# Altium PCB video.altium-ascii.PcbDoc (part 2 of 5)
Units mil, origin at the board's own origin, x right, y up, seen from the top; angles counter-clockwise.
Board outline 12285 x 4200 mil, 4 copper layers (top_copper, Mid-Layer 1, Mid-Layer 2, Bottom Layer), stack 68.6 mil thick; 189 components, 588 nets, 2118 pads, 808 vias.
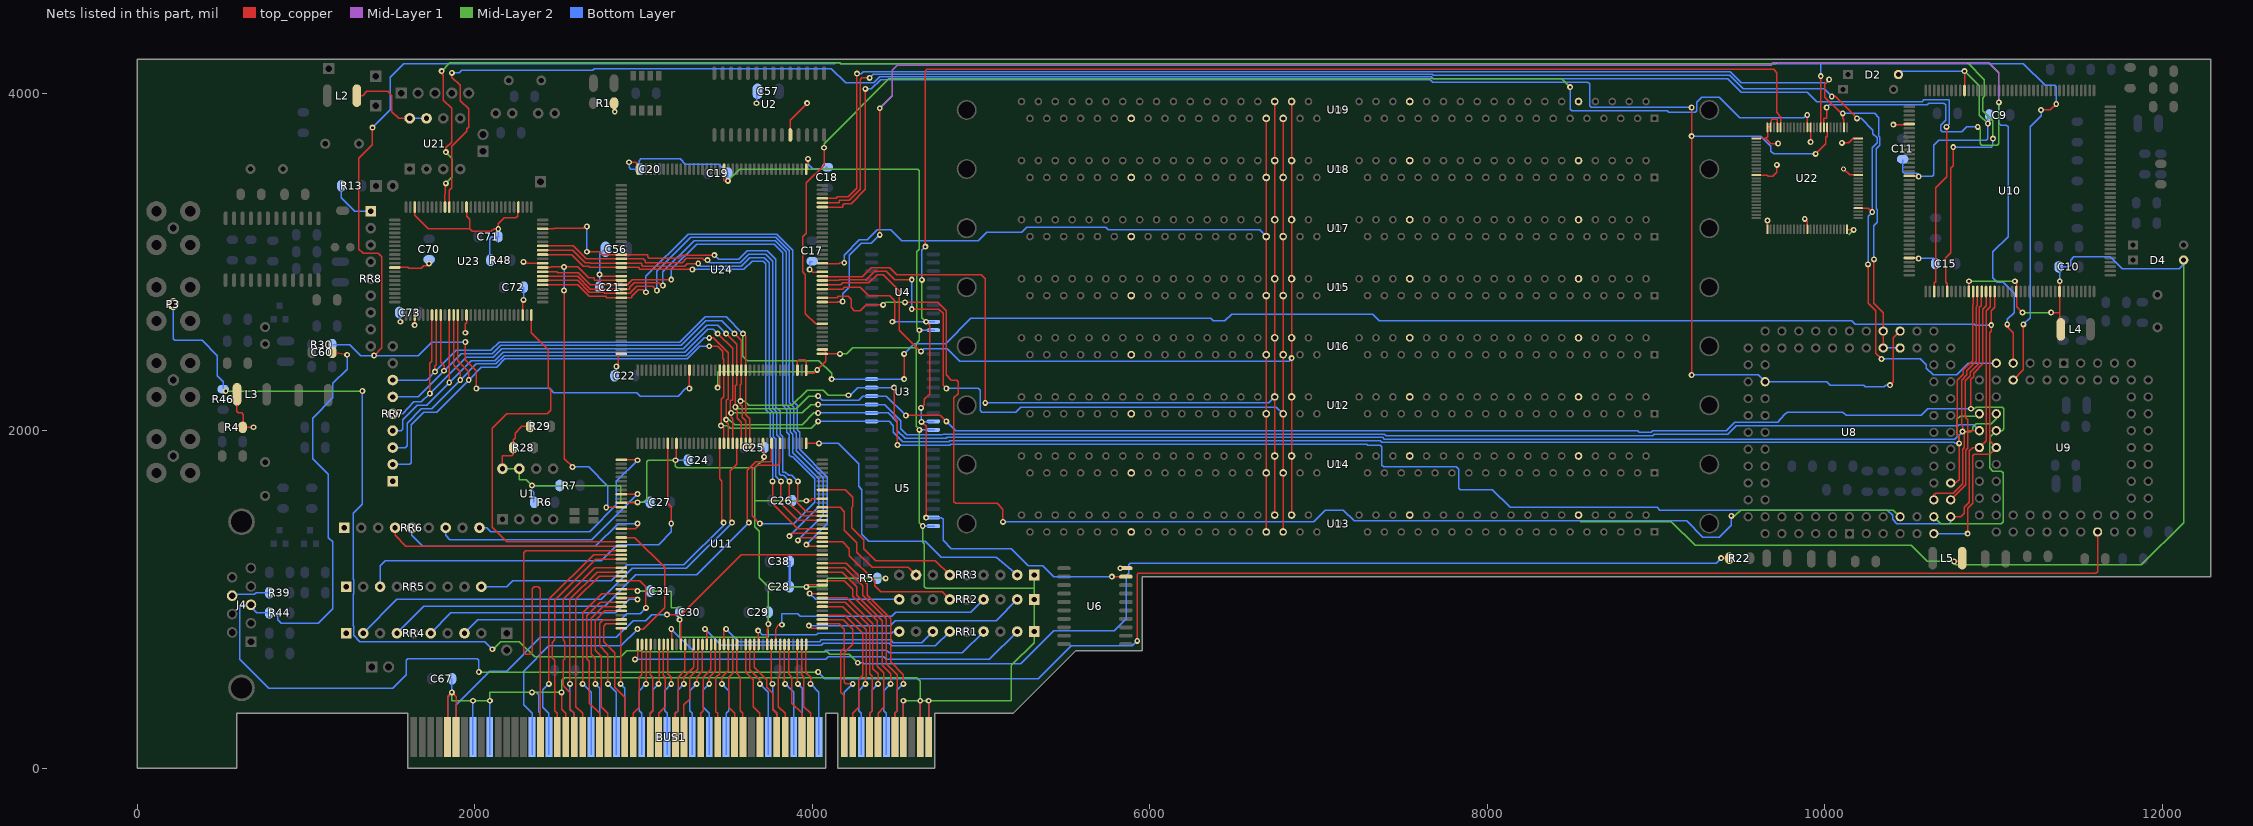
[diagram p4: the nets of this part, all layers, seen from the top]

## Via types
v1: diameter 35, hole 15.75, top_copper to Bottom Layer, 807 vias
v2: diameter 31.5, hole 15.75, top_copper to Bottom Layer, 1 vias

## Nets (pads, with @x,y where several pads share a name; then routed paths per layer and width w, separated by ;. In a path a pad name is that pad's centre, name@x,y a point inside that pad or via, vN(x,y) a via of type N, cw(c..) or ccw(c..) an arc to the next point about the centre after c; other vN are vias at no path point) (continued)
+5V: BUS1.A5 BUS1.A8 BUS1.A10 BUS1.A16 BUS1.A59 BUS1.A61 BUS1.A62 BUS1.B5 BUS1.B6 BUS1.B19 BUS1.B59 BUS1.B61 BUS1.B62 C9.1 C10.1 C11.1 C15.1 C17.1 C18.1 C19.1 C20.1 C21.1 C22.1 C24.1 C25.1 C26.1 C27.1 C28.1 C29.1 C30.1 C31.1 C38.1 C56.1 C57.1 C67.1 C70.1 C71.1 C72.1 C73.1 D2.2 D4.2 L2.1 L3.1 L4.1 L5.1 R1.2 R4.2 R5.2 R6.2 R7.2 R13.1 R28.1 R29.1 R48.1 RR1.1 RR2.1 RR3.1 RR4.1 RR5.1 RR6.1 RR7.1 RR8.1 U1.7 U1.8 U2.10 U3.20 U4.20 U5.20 U6.20 U10.31 U10.45 U10.57 U10.76 U10.91 U10.102 U10.112 U11.11 U11.31 U11.51 U11.71 U11.91 U11.111 U11.131 U11.151 U12.10 U12.30 U12.59 U13.10 U13.30 U13.59 U14.10 U14.30 U14.59 U15.10 U15.30 U15.59 U16.10 U16.30 U16.59 U17.10 U17.30 U17.59 U18.10 U18.30 U18.59 U19.10 U19.30 U19.59 U21.7 U21.8 U22.12 U22.22 U22.24 U22.25 U22.26 U22.37 U22.51 U22.63 U22.75 U22.89 U22.100 U23.3 U23.15 U23.28 U23.40 U23.54 U23.66 U23.78 U23.92 U24.20 U24.38 U24.40 U24.41 U24.42 U24.60 U24.81 U24.100 U24.120 U24.142 U24.160 | length 39088.7
  top_copper w7.87: L3.1@590,2215 590,2115 600,2105 620,2105 630,2095 630,2020 v1(690,2020) ; L2.1@1304.07,3985 1336.46,3985 1361.46,4010 1485,4010 1510,3985 1510,3890 1550,3850 U21.8@1615,3850 ; U23.92@1530,2967 1605,2967 1610,2962 1685,2962 1700,2977 1730,2977 v1(1730,2990) ; v1(1645,2625) U23.3@1645,2690 ; U23.78@1645,3320 1645,3275 1725,3195 1970,3195 ; BUS1.B5@1840,80 BUS1.B5@1840,185 1840,425 v1(1865,450) 1890,425 BUS1.B6@1890,185 BUS1.B6@1890,80 ; v1(1945,2580) 1945,2635 1952,2635 U23.15@1952,2690 ; U23.66@1952,3320 1952,3270 1970,3252 1970,3195 ; U1.8@2165,1775 2165,1850 2220,1850 2230,1860 2230,1900 2230,1945 2240,1955 2240,1985 2280,2025 R29.1@2325,2025 ; U23.54@2259,3320 2255,3290 2255,3270 2245,3260 2175,3260 2140,3225 v1(2140,3195) 2115,3195 2100,3180 1985,3180 1970,3195 ; U23.28@2285,2690 2285,2775 v1(2290,2775) ; v1(2290,3000) 2290,2992 U23.40@2400,2992 ; v1(2515,450) 2515,350 2540,325 BUS1.B19@2540,185 BUS1.B19@2540,80 ; v1(2740,2925) 2740,2915 U24.142@2850,2915 ; v1(2830,3890) R1.2@2830,3940 ; v1(2840,2380) 2850,2380 U24.160@2850,2455 ; U11.151@2850,1060 2965,1060 v1(2965,1050) ; U11.131@2850,1572 2965,1572 v1(2965,1575) ; v1(2915,3590) 2955,3590 2965,3580 U24.120@2965,3568 ; v1(3190,1825) 3195,1825 U11.111@3195,1943 ; v1(3215,880) 3221,880 U11.11@3221,715 ; v1(3440,2255) 3451,2255 U24.20@3451,2340 ; U24.100@3477,3568 3477,3480 v1(3500,3480) ; U11.91@3707,1943 3707,1880 3715,1872 v1(3715,1845) ; U11.31@3733,715 3733,825 3740,825 v1(3740,855) ; U2.10@3870,3749.96 3870,3840 v1(3970,3940) ; U24.38@3912,2340 3912,2410 3922,2420 3955,2420 3965,2410 3965,2350 3963,2340 4010,2340 v1(4030,2360) 4080,2410 U24.41@4080,2455 ; U24.81@3963,3568 3975,3580 v1(3975,3610) ; v1(3965,1075) 3965,1086 U11.51@4078,1086 ; v1(3965,1585) 3995,1585 3995,1598 U11.71@4078,1598 ; v1(3985,2955) 4002.8,2937.2 U24.60@4064.21,2937.2 ; U24.42@4078,2480 4078,2455 v1(4165,2455) ; BUS1.B59@4540,80 BUS1.B59@4540,185 v1(4540,400) ; BUS1.B61@4640,80 BUS1.B61@4640,185 v1(4640,400) ; BUS1.B62@4690,80 BUS1.B62@4690,185 v1(4690,400) ; v1(5825,1185) U6.20@5865,1185 ; U22.37@9590,3514 9657.28,3514 9663.46,3507.82 9691.6,3507.82 9715,3531.22 v1(9715,3575) ; U22.26@9590,3731 9650,3731 ; U22.51@9659,3190 v1(9659,3245) ; U22.22@9718,3800 9718,3842 9715,3845 9685,3845 9680.43,3840.43 9680.43,3830.43 9680,3830 9680,3800 9659,3800 9660,3795 9660,3741 9650,3731 ; v1(9722.52,3700.84) 9680.16,3700.84 9650,3731 ; v1(9880,3255) 9895,3240 U22.63@9895,3190 ; v1(9915,3710) U22.12@9915,3800 ; v1(10100.08,3705.04) 10140.29,3705.04 10166.47,3731.22 U22.100@10196.67,3731.22 ; v2(10110,3550) 10145.32,3514.68 U22.89@10196.67,3514.68 ; U22.75@10131,3190 v1(10170,3190) ; v1(10405,3813) U10.45@10482,3813 ; U10.57@10482,3506 v1(10555,3506) ; U10.76@10495.79,3023.35 10551.65,3023.35 v1(10555,3020) ; v1(10765,1225) 10805,1225 10815,1235 L5.1@10815,1245 ; U10.31@10827,4030 v1(10827,4130) ; U10.91@10853,2802 v1(10853,2885) ; v1(11125,2885) 11135,2875 11135,2802 11135,2735 v1(11170,2700) ; v1(11340,2700) 11391,2700 ; v1(11391,2885) 11391,2802 11391,2700 ; L4.1@11395,2600 11391,2600 11391,2700
  Mid-Layer 2 w7.87: v1(1865,450) 1865,400 v1(1990,400) v1(2090,400) 2090,450 v1(2340,450) v1(2515,450) 2515,520 2535,535 4620,535 4640,515 v1(4640,400) ; U1.8@2165,1775 U1.7@2265,1775 2265,1710 2305,1710 v1(2340,1675) 2865,1675 2865,1575 v1(2965,1575) 3000,1575 3020,1595 3020,1815 3030,1825 v1(3190,1825) 3190,1790 3200,1780 3660,1780 ; v1(2965,1050) 3165,1050 3165,950 3215,950 v1(3215,880) 3215,775 3740,775 v1(3740,855) 3740,1075 ; v1(3440,2255) 3440,2350 4020,2350 v1(4030,2360) ; v1(3500,3480) 3570,3550 3980,3550 ; v1(3715,1845) 3715,1835 3660,1780 ; v1(3965,1585) 3660,1585 ; v1(3975,3610) 3975,3585.25 3975,3555 3980,3550 ; v1(4165,2455) 4205,2455 4240,2490 4615,2490 ; v1(4435,1125) 4090,1125 4090,1075 v1(3965,1075) 3740,1075 ; v1(4540,400) v1(4640,400) ; RR3.1@5315,1145 5315,1065 ; 8550,1460 9090,1460 9230,1320 10510,1320 10605,1225 v1(10765,1225) 10765,1215 10775,1205 11875,1205 12125,1455 D4.2@12125,3010.86 ; 10140,3160 v1(10170,3190) ; v1(10827,4130) 10915,4044 10915,3870 v1(10965,3820) ; v1(10853,2885) v1(11125,2885) ; v1(11170,2700) v1(11340,2700) ; 3660,1585 3660,1430 3685,1405 3685,1130 3740,1075 ; 3660,1585 3660,1780 ; 3980,3550 4625,3550 4635,3540 4635,3075 4620,3060 4620,2610 v1(4635,2595) 4635,2535 4615,2515 4615,2025 v1(4635,2005) 4635,1455 v1(4655,1435) 4655,1340 4665,1330 4665,1075 4675,1065 5315,1065 ; v1(4640,400) v1(4690,400) 5180,400 5180,610 5315,745 RR1.1@5315,810 RR2.1@5315,1000 5315,1065
  Bottom Layer w7.87: R13.1@1209.01,3450.94 1209.01,3380.99 1290,3300 RR8.1@1365,3300 ; C73.1@1550,2700 1550,2675 1560,2665 v1(1560,2645) ; U21.8@1615,3850 U21.7@1715,3850 ; v1(1730,2990) C70.1@1730,3010 ; BUS1.A5@1840,80 BUS1.A5@1840,185 1840,425 v1(1865,450) C67.1@1865,530 ; BUS1.A8@1990,80 BUS1.A8@1990,185 v1(1990,400) ; BUS1.A10@2090,80 BUS1.A10@2090,185 v1(2090,400) ; R48.1@2090,3010 2090,3140 2100,3150 C71.1@2145,3150 ; 2090,3135 2100,3145 2135,3145 2140,3150 v1(2140,3195) ; v1(2290,2775) C72.1@2290,2850 ; v1(2340,450) 2365,450 2380,435 2380,335 2390,325 BUS1.A16@2390,185 BUS1.A16@2390,80 ; R6.2@2350,1575 2350,1635 2340,1645 v1(2340,1675) R7.2@2500,1675 ; C21.1@2740,2850 v1(2740,2925) 2740,3045 2770,3075 C56.1@2778.29,3075 ; C22.1@2825,2325 2840,2325 v1(2840,2380) ; v1(2915,3590) 2915,3560 2925,3550 2975,3550 2975,3600 2985,3610 3217.55,3610 3248.42,3579.13 3445.87,3579.13 3500,3525 v1(3500,3480) ; v1(2965,1050) C31.1@3035,1050 ; v1(2965,1575) C27.1@3035,1575 ; v1(3190,1825) C24.1@3260,1825 ; v1(3215,880) C30.1@3215,925 ; v1(3670,3939.94) C57.1@3670,4010 ; v1(3715,1845) C25.1@3715,1900 ; v1(3740,855) C29.1@3740,925 ; C28.1@3870,1075 3870,1225 3865,1225 3865,1075 v1(3965,1075) ; C26.1@3885,1585 v1(3965,1585) ; v1(3975,3610) 3975,3580.25 4002.75,3552.5 4077.5,3552.5 C18.1@4090,3565 ; v1(3985,2955) 3985,3000 C17.1@4000,3000 ; R5.2@4390,1125 v1(4435,1125) ; BUS1.A59@4540,80 BUS1.A59@4540,185 v1(4540,400) ; v1(4635,2005) U3.20@4725,2005 ; v1(4635,2595) U4.20@4725,2595 ; BUS1.A61@4640,80 BUS1.A61@4640,185 v1(4640,400) ; v1(4655,1435) U5.20@4725,1435 ; BUS1.A62@4690,80 BUS1.A62@4690,185 v1(4690,400) ; D2.2@10435,4110 10455,4130 v1(10827,4130) ; C11.1@10460,3605 10460,3535 10470,3525 10545,3525 10555,3515 v1(10555,3506) 10635,3506 10645,3516 10645,3690 10675,3720 10955,3720 10965,3730 v1(10965,3820) 10965,3870 C9.1@10970,3870 ; v1(10555,3020) 10640,3020 10650,3010 C15.1@10650,2990 ; v1(11391,2885) 11391,2970 11445,2970 11455,2980 11455,3010 11475,3030 11690,3030 11760,2960 12100,2960 12125,2985 D4.2@12125,3010.86
/ACCES_RAM-: U3.19 U4.19 U5.19 U6.19 U22.21 U24.56 | length 10405.8
  top_copper w7.87: U24.56@4078,2839 4180,2839 4191,2850 4285,2850 4335,2800 4460,2800 4490,2770 4490,2660 v1(4475,2645) ; v1(4645,2135) 4665,2155 4665,2185 4695,2215 4695,2625 v1(4675,2645) ; v1(4647.51,2052.49) 4675,2025 v1(4675,1485) ; v1(4670,3090) 4670,4130 4680,4140 9695,4140 9715,4120 9715,3885 9730,3870 9730,3867 9737,3860 U22.21@9737,3800 ; v1(5775,1135) U6.19@5865,1135
  Mid-Layer 2 w7.87: v1(4649.84,2893.5) 4649.84,2670.16 v1(4675,2645)
  Bottom Layer w7.87: v1(4475,2645) v1(4675,2645) U4.19@4725,2645 ; v1(4645,2135) 4645,2055 v1(4647.51,2052.49) U3.19@4722.49,2052.49 ; v1(4649.84,2893.5) 4649.84,3069.84 v1(4670,3090) ; v1(4675,1485) 4725,1485 4765,1485 4775,1475 4775,1350 4825,1300 5180,1300 5280,1200 5365,1200 5430,1135 v1(5775,1135)
/ACQ_ON: U22.13 U24.48 | length 7543.3
  top_copper w7.87: v1(4070,3676.08) 4070,3573.5 3965,3468.5 3965,3170 3945,3150 3945,2940 3960,2925 3960,2694 4020,2634 U24.48@4078,2634 ; U22.13@9895,3800 v1(9895,3870)
  Mid-Layer 2 w7.87: v1(4070,3676.08) 4070,3700.83 4454.17,4085 8440,4085 v1(8490,4035)
  Bottom Layer w7.87: v1(8490,4035) 8490,3905 8500,3895 9065,3895 9075,3885 9230,3885 9240,3895 9240,3945 9270,3975 9375,3975 9495,3855 9875,3855 9890,3870 v1(9895,3870)
/ADR2: U11.68 U23.48 U24.137 | length 3326.7
  top_copper w7.87: U23.48@2400,3197 2470,3197 2473,3200 2645,3200 2655,3210 v1(2665,3210) ; v1(2665,3060) 2738,3060 2755,3043 2850,3043 3025,3043 3025,3030 3035,3020 3210,3020 3230,3040 v1(3420,3040) ; v1(3915,1700) 3915,1571 3965,1521 U11.68@4078,1521
  Bottom Layer w7.87: v1(2665,3060) v1(2665,3210) ; v1(3420,3040) 3445,3015 3565,3015 3615,3065 3735,3065 3785,3015 3785,2140 3810,2115 3810,1980 3825,1965 3825,1755 3840,1755 3860,1735 3880,1735 v1(3915,1700)
/ADR3: U11.67 U23.44 U24.138 | length 3201.9
  top_copper w7.87: U23.44@2400,3095 2585,3095 2660,3018 2850,3018 3000,3018 3010,3008 3010,2995 3230,2995 3255,3020 3350,3020 3360,3010 v1(3380,3010) ; v1(3865,1700) 3865,1570 3940,1495 U11.67@4078,1495
  Bottom Layer w7.87: v1(3380,3010) 3395,2995 3575,2995 3625,3045 3725,3045 3765,3005 3765,2135 3790,2110 3790,1975 3805,1960 3805,1745 3815,1735 3830,1735 v1(3865,1700)
/ADR4: U11.66 U23.43 U24.139 | length 3196.7
  top_copper w7.87: U23.43@2400,3069 2580,3069 2654,2995 2685,2995 2685,2992 2850,2992 2990,2992 2990,2980 2995,2975 3245,2975 3260,2990 v1(3325,2990) ; v1(3815,1700) 3815,1570 3915,1470 U11.66@4078,1470
  Bottom Layer w7.87: v1(3325,2990) 3340,2975 3580,2975 3630,3025 3715,3025 3745,2995 3745,2130 3770,2105 3770,1965 3785,1950 3785,1730 v1(3815,1700)
/ADR5: U11.64 U23.42 U24.140 | length 3213.8
  top_copper w7.87: U23.42@2400,3043 2575,3043 2643,2975 2680,2975 2680,2967 2850,2967 2975,2967 2975,2955 v1(3290,2955) ; v1(3765,1700) 3765,1568 3915,1418 U11.64@4078,1418
  Bottom Layer w7.87: v1(3290,2955) 3595,2955 3645,3005 3710,3005 3725,2990 3725,2125 3750,2100 3750,1960 3765,1945 v1(3765,1700)
/ADR6: U11.132 U23.39 U24.143 | length 2157.8
  top_copper w7.87: U23.39@2400,2967 2455,2967 2455,2970 v1(2530,2970) 2610,2970 2675,2905 2710,2905 2710,2890 U24.143@2850,2890 ; v1(2530,2830) 2530,1835 v1(2580,1785) ; v1(2780,1545) 2781,1546 U11.132@2850,1546
  Bottom Layer w7.87: v1(2530,2830) v1(2530,2970) ; v1(2580,1785) 2675,1785 2790,1670 2790,1555 v1(2780,1545)
/BE-0: U11.87 U23.38 U24.144 | length 4214
  top_copper w7.87: U23.38@2400,2941 2490,2941 2490,2935 2615,2935 2685,2864 2850,2864 2910,2864 2910,2870 2935,2895 v1(3165,2895) ; v1(3690,1450) 3645,1495 3645,1770 3670,1795 3795,1795 3809,1809 U11.87@3809,1943
  Bottom Layer w7.87: v1(3165,2895) 3165,2955 3315,3105 3775,3105 3825,3055 3825,2150 3850,2125 3850,1990 3865,1975 3865,1855 3875,1845 3885,1845 4015,1715 4015,1575 3890,1450 v1(3690,1450)
/BE-1: U11.63 U23.37 U24.145 | length 3746.6
  top_copper w7.87: U23.37@2400,2915 2610,2915 2685,2839 2850,2839 2920,2839 2920,2850 2945,2875 3090,2875 3105,2860 v1(3115,2860) ; v1(3865,1375) 3883,1393 U11.63@4078,1393
  Bottom Layer w7.87: v1(3115,2860) 3115,2940 3300,3125 3780,3125 3845,3060 3845,2155 3870,2130 3870,1995 3885,1980 3885,1870 4040,1715 4040,1550 v1(3865,1375)
/BE-2: U11.62 U23.36 U24.146 | length 3790.9
  top_copper w7.87: U23.36@2400,2890 2610,2890 2680,2820 2765,2820 2770,2815 2785,2815 2785,2813 2850,2813 2925,2813 2925,2820 2960,2855 3055,2855 v1(3080,2830) ; v1(3915,1350) 3932,1367 U11.62@4078,1367
  Bottom Layer w7.87: v1(3080,2830) 3080,2945 3280,3145 3785,3145 3865,3065 3865,2165 3890,2140 3890,2000 3905,1985 3905,1880 4065,1720 4065,1500 v1(3915,1350)
/BE-3: U11.60 U23.35 U24.147 | length 3794
  top_copper w7.87: U23.35@2400,2864 2610,2864 2679,2795 2780,2795 2780,2787 2850,2787 2930,2787 2930,2795 2970,2835 3000,2835 v1(3015,2820) ; v1(3965,1325) 3965,1316 U11.60@4078,1316
  Bottom Layer w7.87: v1(3015,2820) 3015,2915 3265,3165 3790,3165 3885,3070 3885,2175 3910,2150 3910,2005 3925,1990 3925,1890 4090,1725 4090,1450 v1(3965,1325)
/BLANK-: U9.7 U22.8 U24.53 | length 11860.8
  top_copper w7.87: U24.53@4078,2762 4150,2762 4147,2765 v1(4180,2765) ; v1(4400,3160) v1(4400,3910) ; U22.8@9993,3800 9993,3850 10010,3850 v1(10010,3915) ; v1(11080,2630) 11080,2615 11115,2580 U9.7@11115,2400
  Mid-Layer 1 w7.87: v1(4400,3910) 4475,3985 4475,4135 4505,4165 9680,4165 9690,4180 10970,4180 11030,4120 v1(11030,3945)
  Mid-Layer 2 w7.87: v1(10905,3800) 10920,3785 10920,3700 10930,3690 11020,3690 11030,3700 v1(11030,3945)
  Bottom Layer w7.87: v1(4180,2765) 4180,2810 4220,2850 4220,3040 4290,3110 4350,3110 v1(4400,3160) ; v1(10010,3915) 10025,3930 10605,3930 10615,3940 10705,3940 10715,3930 10715,3840 10685,3810 10685,3780 10695,3770 10810,3770 10840,3800 v1(10905,3800) ; v1(11030,3945) 11030,3820 11040,3810 11075,3810 11085,3800 11085,3150 10995,3060 10995,2905 11020,2880 11055,2880 11120,2815 11120,2700 11080,2660 v1(11080,2630)
/BLUE_IN: P3.1 R22.1 R46.1 | length 11744.4
  top_copper w7.87: v1(9385,1245) R22.1@9430,1245
  Mid-Layer 2 w7.87: v1(525,2235) v1(1335,2235) ; v1(2105,705) 2110,705 2155,750 2265,750 2355,660 2865,660 2900,695 2985,695 2990,690 4090,690 4105,675 4220,675 v1(4270,625)
  Bottom Layer w7.87: P3.1@215,2750 215,2545 225,2535 385,2535 475,2445 475,2325 510,2290 510,2250 v1(525,2235) ; v1(1335,2235) 1335,1565 1279.76,1509.76 1279.76,1118.31 1280.94,1118.31 1283.31,1115.94 1283.31,1034.06 1280.94,1031.69 1279.76,1031.69 1279.76,843.31 1280.94,843.31 1283.31,840.94 1283.31,786.69 1320,750 2060,750 v1(2105,705) ; v1(4270,625) 4300,625 4305,620 5235,620 5430,815 5790,815 5860,885 5860,1140 5875,1155 5875,1205 5885,1215 9355,1215 v1(9385,1245)
/BLUE_OUT: C60.2 J4.3 R44.2 U9.39 | length 14698.9
  top_copper w7.87: C60.2@1158.68,2464 v1(1245,2450) ; v1(5925.63,755) 5925.63,1150.63 5930,1155 11605,1155 11615,1165 U9.39@11615,1400
  Mid-Layer 2 w7.87: v1(2025,570) v1(4035,570)
  Bottom Layer w7.87: v1(1245,2450) 1245,2365 1160,2280 1160,2195 1040,2075 1040,1835 1134.09,1740.91 1134.09,1365.91 1159.13,1340.87 1159.13,944.13 1075,860 855,860 835,880 835,899.68 814.68,920 782.3,920 710,920 665,965 620,965 610,955 610,645 780,475 1515,475 1595,555 1595,640 1605,650 2015,650 2025,640 v1(2025,570) ; v1(4035,570) 4075,530 5340,530 5535,725 5895.63,725 v1(5925.63,755)
/BPCLK: U11.140 U23.30 | length 2373.9
  top_copper w7.87: U23.30@2336,2690 2336,2579 2435,2480 2435,2255 2450,2240 2450,2120 2430,2100 2190,2100 2105,2015 2105,1427 2190,1342 U11.140@2850,1342
/BT812_RD-: U10.86 U23.71 | length 11644.5
  top_copper w7.87: v1(1805,4130) 1805,4115 1815,4105 1815,3958.31 1863.31,3910 1863.31,3708.06 1830,3674.75 v1(1830,3650) ; U23.71@1824,3320 1824,3405 1825,3405 1825,3460 v1(1830,3465) ; U10.86@10725,2802 10725,2870 10715,2880 10715,3025 10745,3055 10745,3555 10760,3570 v1(10760,3680)
  Mid-Layer 2 w7.87: v1(1805,4130) 1854.11,4179.11 4163.56,4179.11 4167.67,4175 9705,4175 9710,4180 10845,4180 10945,4080 10945,3980 10935,3970 10935,3895 10995,3835 v1(10995,3730) ; v1(1830,3465) 1865,3500 1865,3615 v1(1830,3650)
  Bottom Layer w7.87: v1(10760,3680) 10985,3680 10995,3690 v1(10995,3730)
/BT812_WR-: U10.83 U23.70 | length 11083.6
  top_copper w7.87: U23.70@1850,3320 1850,3425 1865,3440 1865,3685 1953.5,3773.5 1953.5,3788.05 1964.19,3798.74 1964.19,3905.69 1964.25,3905.75 1915,3955 1915,4045 1865,4095 v1(1865,4120) ; U10.83@10648,2802 10648,2880 10655,2880 10655,3440 10720,3505 v1(10720,3800)
  Bottom Layer w7.87: v1(1865,4120) 1910,4120 1925,4135 2700,4135 2710,4145 4112.84,4145 4197.84,4060 4363.19,4060 4398.99,4095.81 7667.12,4095.81 7677.92,4085 9425,4085 9505,4005 9895,4005 9950,3950 10575,3950 10585,3960 10735,3960 10737.5,3957.5 10737.5,3817.5 v1(10720,3800)
/buspci.sch/EA1: RR2.6 U11.61 | length 920.5
  top_copper w7.87: U11.61@4078,1342 4180,1342 4220,1300.7 4220,1260 4370,1110 4370,1080 4405,1045 4770,1045 RR2.6@4815,1000
/buspci.sch/EA2: RR3.8 U11.69 | length 800.3
  top_copper w7.87: U11.69@4078,1546 4165,1546 4190,1521 4190,1410 4265,1335 4265,1280 4355,1190 4570,1190 RR3.8@4615,1145
/buspci.sch/EA3: RR3.6 U11.73 | length 1090.2
  top_copper w7.87: U11.73@4078,1649 4195,1649 4240,1605 4240,1550 4235,1545 4235,1425 4305,1355 4305,1300 4375,1230 4730,1230 RR3.6@4815,1145
/buspci.sch/EA4: RR3.2 U11.81 | length 1804.2
  top_copper w7.87: U11.81@3963,1925 v1(4040,1925)
  Bottom Layer w7.87: v1(4040,1925) 4155,1925 4275,1805 4275,1670 4295,1650 4295,1385 4335,1345 4670,1345 4765,1250 5090,1250 RR3.2@5215,1145
/buspci.sch/EA5: RR4.4 U11.89 | length 2962.2
  top_copper w7.87: v1(3625,1455) 3615,1465 3615,1765 3665,1815 3758,1815 U11.89@3758,1943
  Bottom Layer w7.87: RR4.4@1540,800 1700,960 2770,960 2955,1145 3315,1145 v1(3625,1455)
/buspci.sch/EA6: RR4.2 U11.97 | length 2964.2
  top_copper w7.87: v1(3525,1455) 3515,1465 3515,1762 3553,1800 U11.97@3553,1943
  Bottom Layer w7.87: RR4.2@1340,800 1540,1000 2750,1000 2935,1185 3255,1185 v1(3525,1455)
/buspci.sch/EA7: RR5.9 U11.101 | length 2099.1
  top_copper w7.87: U11.101@3451,1943 3451,1714 3465,1700 3465,1465 v1(3475,1455)
  Bottom Layer w7.87: RR5.9@2040,1075 2190,1075 2225,1110 2810,1110 2905,1205 3240,1205 3475,1440 v1(3475,1455)
/buspci.sch/EA9: RR5.3 U11.113 | length 2484.5
  top_copper w7.87: U11.113@3144,1943 3144,1571 3165,1550 v1(3165,1450)
  Bottom Layer w7.87: RR5.3@1440,1075 1440,1200 1470,1230 2750,1230 2845,1325 3090,1325 3165,1400 v1(3165,1450)
/buspci.sch/EA10: RR6.9 U11.121 | length 1321.7
  top_copper w7.87: U11.121@2850,1828 2965,1828 v1(2965,1825)
  Bottom Layer w7.87: RR6.9@2028.58,1425 2073.12,1425 2096.75,1401.38 2681.38,1401.38 2840,1560 2840,1700 v1(2965,1825)
/buspci.sch/EA11: RR6.7 U11.129 | length 1420.3
  top_copper w7.87: U11.129@2850,1623 2965,1623 v1(2965,1625)
  Bottom Layer w7.87: RR6.7@1828.58,1425 1828.58,1380.46 1854.04,1355 2695,1355 v1(2965,1625)
/buspci.sch/EA12: RR6.5 U11.137 | length 1603.7
  top_copper w7.87: U11.137@2850,1418 2952.5,1418 2965,1430.5 v1(2965,1450)
  Bottom Layer w7.87: RR6.5@1628.58,1425 1628.58,1380.46 1694.04,1315 2715,1315 2850,1450 v1(2965,1450)
/buspci.sch/EA13: RR6.4 U11.141 | length 1392.7
  top_copper w7.87: RR6.4@1528.58,1425 1528.58,1380.46 1593.04,1316 U11.141@2850,1316
/buspci.sch/EA14: RR4.8 U11.149 | length 1442
  top_copper w7.87: U11.149@2850,1111 2979,1111 3015,1075 v1(3015,950)
  Bottom Layer w7.87: RR4.8@1940,800 2020,880 2865,880 2900,915 2980,915 v1(3015,950)
/buspci.sch/EA15: RR4.6 U11.153 | length 1431.8
  top_copper w7.87: U11.153@2850,1009 2965,1009 v1(2965,1000)
  Bottom Layer w7.87: RR4.6@1740,800 1860,920 2835,920 2915,1000 v1(2965,1000)
/buspci.sch/EQ0: RR1.2 U11.1 | length 2422
  top_copper w7.87: v1(2950,645) 2965,660 U11.1@2965,715
  Bottom Layer w7.87: v1(2950,645) 4080,645 4095,660 4425,660 4440,645 5050,645 RR1.2@5215,810
/buspci.sch/EQ1: RR1.4 U11.9 | length 2082.1
  top_copper w7.87: v1(3165,825) 3169,825 U11.9@3169,715
  Bottom Layer w7.87: v1(3165,825) 3300,690 4070,690 4080,700 4440,700 4455,685 4890,685 RR1.4@5015,810
/buspci.sch/EQ2: RR1.6 U11.17 | length 1653.9
  top_copper w7.87: v1(3365,825) 3374,825 U11.17@3374,715
  Bottom Layer w7.87: v1(3365,825) 3460,730 4055,730 4065,740 4455,740 4470,725 4730,725 RR1.6@4815,810
/buspci.sch/EQ3: RR1.7 U11.21 | length 1416.3
  top_copper w7.87: U11.21@3477,715 3477,825 v1(3490,825)
  Bottom Layer w7.87: v1(3490,825) 3565,750 4045,750 4055,760 4465,760 4480,745 4650,745 RR1.7@4715,810
/buspci.sch/EQ4: RR1.9 U11.29 | length 954.6
  top_copper w7.87: v1(3680,815) 3680,715 U11.29@3681,715
  Bottom Layer w7.87: v1(3680,815) 3705,790 4025,790 4035,800 4470,800 4480,810 RR1.9@4515,810
/buspci.sch/EQ5: RR2.4 U11.33 | length 1467.3
  top_copper w7.87: U11.33@3784,715 3784,825 3800,850 v1(3820,850)
  Bottom Layer w7.87: v1(3820,850) 3820,915 3915,915 3930,900 4470,900 4495,925 4940,925 RR2.4@5015,1000
/buspci.sch/EQ6: RR2.2 U11.41 | length 1403.4
  top_copper w7.87: v1(3980,845) 3995,830 U11.41@4078,830
  Bottom Layer w7.87: v1(3980,845) 4463,845 4493,875 5090,875 RR2.2@5215,1000
/buspci.sch/EQ7: RR2.9 U11.49 | length 638.5
  top_copper w7.87: v1(3985,1035) 3985,1034 U11.49@4078,1034
  Bottom Layer w7.87: v1(3985,1035) 4020,1000 RR2.9@4515,1000
/buspci.sch/P_AD0: BUS1.A58 U11.56 | length 1418.1
  top_copper w7.87: U11.56@4078,1214 4201,1214 4325,1090 4325,1025 4465,885 4465,630 4540,555 v1(4540,500)
  Bottom Layer w7.87: BUS1.A58@4490,80 BUS1.A58@4490,185 4490,325 4505,340 4505,465 v1(4540,500)
/buspci.sch/P_AD1: BUS1.B58 U11.55 | length 1357.9
  top_copper w7.87: U11.55@4078,1188 4192,1188 4300,1080 4300,1025 4440,885 4440,620 4505,555 4505,340 4490,325 BUS1.B58@4490,185 BUS1.B58@4490,80
/buspci.sch/P_AD2: BUS1.A57 U11.54 | length 1323.7
  top_copper w7.87: U11.54@4078,1162 4178,1162 4265,1075 4265,1025 4415,875 4415,610 4465,560 v1(4465,500)
  Bottom Layer w7.87: BUS1.A57@4440,80 BUS1.A57@4440,185 4440,325 4425,340 4425,460 v1(4465,500)
/buspci.sch/P_AD3: BUS1.B56 U11.52 | length 1254.3
  top_copper w7.87: U11.52@4078,1111 4189,1111 4240,1060 4240,1020 4385,875 4385,605 4425,565 4425,360 4390,325 BUS1.B56@4390,185 BUS1.B56@4390,80
/buspci.sch/P_AD4: BUS1.A55 U11.48 | length 1153.9
  top_copper w7.87: U11.48@4078,1009 4206,1009 4360,855 4360,590 4390,560 v1(4390,500)
  Bottom Layer w7.87: BUS1.A55@4340,80 BUS1.A55@4340,185 4340,325 4355,340 4355,465 v1(4390,500)
/buspci.sch/P_AD5: BUS1.B55 U11.47 | length 1093.7
  top_copper w7.87: U11.47@4078,983 4197,983 4340,840 4340,560 4355,545 4355,340 4340,325 BUS1.B55@4340,185 BUS1.B55@4340,80
/buspci.sch/P_AD6: BUS1.A54 U11.46 | length 1064
  top_copper w7.87: U11.46@4078,958 4182,958 4320,820 4320,535 4315,530 v1(4315,500)
  Bottom Layer w7.87: BUS1.A54@4290,80 BUS1.A54@4290,185 4290,325 4275,340 4275,460 v1(4315,500)
/buspci.sch/P_AD7: BUS1.B53 U11.44 | length 1010.8
  top_copper w7.87: U11.44@4078,906 4194,906 4300,800 4300,550 4275,525 4275,360 4240,325 BUS1.B53@4240,185 BUS1.B53@4240,80
/buspci.sch/P_AD8: BUS1.B52 U11.42 | length 886
  top_copper w7.87: U11.42@4078,855 4160,855 4190,825 4190,710 4170,690 4170,450 4190,430 BUS1.B52@4190,185 BUS1.B52@4190,80
/buspci.sch/P_AD9: BUS1.A49 U11.40 | length 666.9
  top_copper w7.87: U11.40@3963,715 3963,567 3990,540 v1(3990,500)
  Bottom Layer w7.87: v1(3990,500) 4040,450 BUS1.A49@4040,185 BUS1.A49@4040,80
/buspci.sch/P_AD10: BUS1.B48 U11.39 | length 657
  top_copper w7.87: U11.39@3937,715 3937,553 3950,540 3950,365 3990,325 BUS1.B48@3990,185 BUS1.B48@3990,80
/buspci.sch/P_AD11: BUS1.A47 U11.38 | length 648.4
  top_copper w7.87: U11.38@3912,715 3912,500 v1(3915,500)
  Bottom Layer w7.87: v1(3915,500) 3940,475 BUS1.A47@3940,185 BUS1.A47@3940,80
/buspci.sch/P_AD12: BUS1.B47 U11.36 | length 667.7
  top_copper w7.87: U11.36@3861,715 3861,559 3880,540 3880,385 3940,325 BUS1.B47@3940,185 BUS1.B47@3940,80
/buspci.sch/P_AD13: BUS1.A46 U11.35 | length 660.7
  top_copper w7.87: U11.35@3835,715 3835,500 v1(3840,500)
  Bottom Layer w7.87: v1(3840,500) 3890,450 BUS1.A46@3890,185 BUS1.A46@3890,80
/buspci.sch/P_AD14: BUS1.B45 U11.34 | length 655.3
  top_copper w7.87: U11.34@3809,715 3809,549 3800,540 3800,365 3840,325 BUS1.B45@3840,185 BUS1.B45@3840,80
/buspci.sch/P_AD15: BUS1.A44 U11.32 | length 652.4
  top_copper w7.87: U11.32@3758,715 3758,500 v1(3765,500)
  Bottom Layer w7.87: v1(3765,500) 3765,350 3790,325 BUS1.A44@3790,185 BUS1.A44@3790,80
/buspci.sch/P_AD16: BUS1.A32 U11.14 | length 679.3
  top_copper w7.87: v1(3240,500) 3240,540 3297,597 U11.14@3297,715
  Bottom Layer w7.87: BUS1.A32@3190,80 BUS1.A32@3190,185 3190,325 3205,340 3205,465 v1(3240,500)
/buspci.sch/P_AD17: BUS1.B32 U11.12 | length 658.2
  top_copper w7.87: BUS1.B32@3190,80 BUS1.B32@3190,185 3190,325 3205,340 3205,540 3246,581 U11.12@3246,715
/buspci.sch/P_AD18: BUS1.A31 U11.8 | length 666.5
  top_copper w7.87: U11.8@3144,715 3144,561 3165,540 v1(3165,500)
  Bottom Layer w7.87: BUS1.A31@3140,80 BUS1.A31@3140,185 3140,325 3125,340 3125,460 v1(3165,500)
/buspci.sch/P_AD19: BUS1.B30 U11.7 | length 656.5
  top_copper w7.87: BUS1.B30@3090,80 BUS1.B30@3090,185 3090,325 3130,365 3130,540 3118,552 U11.7@3118,715
/buspci.sch/P_AD20: BUS1.A29 U11.6 | length 658.7
  top_copper w7.87: v1(3090,500) 3093,500 U11.6@3093,715
  Bottom Layer w7.87: BUS1.A29@3040,80 BUS1.A29@3040,185 3040,325 3055,340 3055,465 v1(3090,500)
/buspci.sch/P_AD21: BUS1.B29 U11.4 | length 647
  top_copper w7.87: BUS1.B29@3040,80 BUS1.B29@3040,185 3040,325 3055,340 3055,540 3041,554 U11.4@3041,715
/buspci.sch/P_AD22: BUS1.A28 U11.3 | length 658.8
  top_copper w7.87: v1(3015,500) 3016,500 U11.3@3016,715
  Bottom Layer w7.87: BUS1.A28@2990,80 BUS1.A28@2990,185 2990,325 2975,340 2975,460 v1(3015,500)
/buspci.sch/P_AD23: BUS1.B27 U11.2 | length 655.7
  top_copper w7.87: BUS1.B27@2940,80 BUS1.B27@2940,185 2940,325 2975,360 2975,540 2990,555 U11.2@2990,715
/buspci.sch/P_AD24: BUS1.A25 U11.158 | length 940.1
  top_copper w7.87: v1(2790,500) 2790,675 2740,725 2740,860 2761,881 U11.158@2850,881
  Bottom Layer w7.87: v1(2790,500) 2840,450 BUS1.A25@2840,185 BUS1.A25@2840,80
/buspci.sch/P_AD25: BUS1.B24 U11.156 | length 984.7
  top_copper w7.87: BUS1.B24@2790,80 BUS1.B24@2790,185 2790,325 2750,365 2750,665 2715,700 2715,875 2772,932 U11.156@2850,932
/buspci.sch/P_AD26: BUS1.A23 U11.155 | length 1018.9
  top_copper w7.87: v1(2715,500) 2715,650 2690,675 2690,890 2758,958 U11.155@2850,958
  Bottom Layer w7.87: v1(2715,500) 2740,475 BUS1.A23@2740,185 BUS1.A23@2740,80
/buspci.sch/P_AD27: BUS1.B23 U11.154 | length 1073.4
  top_copper w7.87: BUS1.B23@2740,80 BUS1.B23@2740,185 2740,325 2680,385 2680,635 2665,650 2665,905 2743,983 U11.154@2850,983
/buspci.sch/P_AD28: BUS1.A22 U11.152 | length 1117.9
  top_copper w7.87: v1(2640,500) 2640,920 2754,1034 U11.152@2850,1034
  Bottom Layer w7.87: v1(2640,500) 2690,450 BUS1.A22@2690,185 BUS1.A22@2690,80
/buspci.sch/P_AD29: BUS1.B21 U11.148 | length 1243.3
  top_copper w7.87: BUS1.B21@2640,80 BUS1.B21@2640,185 2640,325 2600,365 2600,1000 2737,1137 U11.148@2850,1137
/buspci.sch/P_AD30: BUS1.A20 U11.147 | length 1282.5
  top_copper w7.87: v1(2565,500) 2565,1000 2727,1162 U11.147@2850,1162
  Bottom Layer w7.87: v1(2565,500) 2565,350 2590,325 BUS1.A20@2590,185 BUS1.A20@2590,80
/buspci.sch/P_AD31: BUS1.B20 U11.146 | length 1358.1
  top_copper w7.87: BUS1.B20@2590,80 BUS1.B20@2590,185 2590,325 2565,350 2565,450 2525,490 2525,640 2535,650 2535,750 2525,760 2525,1000 2713,1188 U11.146@2850,1188
/buspci.sch/P_CLK: BUS1.B16 U11.142 | length 2633.4
  top_copper w7.87: BUS1.B16@2390,80 BUS1.B16@2390,185 2390,1062.5 2377.5,1075 2352.5,1075 2340,1062.5 2340,687.5 2327.5,675 2302.5,675 2290,687.5 2290,1277.5 2302.5,1290 U11.142@2850,1290
/buspci.sch/P_C{slash}BE0#: BUS1.A52 U11.43 | length 1015.8
  top_copper w7.87: U11.43@4078,881 4184,881 4240,825 4240,735 4190,685 4190,510 4200,500 v1(4240,500)
  Bottom Layer w7.87: BUS1.A52@4190,80 BUS1.A52@4190,185 4190,450 v1(4240,500)
/buspci.sch/P_C{slash}BE1#: BUS1.B44 U11.28 | length 690.5
  top_copper w7.87: U11.28@3656,715 3656,599 3730,525 3730,480 3765,445 3765,350 3790,325 BUS1.B44@3790,185 BUS1.B44@3790,80
/buspci.sch/P_C{slash}BE2#: BUS1.B33 U11.15 | length 669.4
  top_copper w7.87: BUS1.B33@3240,80 BUS1.B33@3240,185 3240,375 3275,410 3275,540 3323,588 U11.15@3323,715
/buspci.sch/P_C{slash}BE3#: BUS1.B26 U11.159 | length 904.5
  top_copper w7.87: U11.159@2850,855 2777.5,855 2765,842.5 2765,750 2830,685 2830,480 2890,420 BUS1.B26@2890,185 BUS1.B26@2890,80
/buspci.sch/P_DEVSEL#: BUS1.B37 U11.20 | length 647.8
  top_copper w7.87: BUS1.B37@3440,80 BUS1.B37@3440,185 3440,325 3430,335 3430,540 3451,561 U11.20@3451,715
/buspci.sch/P_FRAME#: BUS1.A34 U11.16 | length 671.9
  top_copper w7.87: v1(3315,500) 3315,540 3349,574 U11.16@3349,715
  Bottom Layer w7.87: BUS1.A34@3290,80 BUS1.A34@3290,185 3290,325 3275,340 3275,460 v1(3315,500)
/buspci.sch/P_GNT#: BUS1.A17 U11.143 | length 1468.8
  top_copper w7.87: v1(2440,500) 2440,1000 2705,1265 U11.143@2850,1265
  Bottom Layer w7.87: BUS1.A17@2440,80 BUS1.A17@2440,185 2440,325 2405,360 2405,465 v1(2440,500)
/buspci.sch/P_IDSEL: BUS1.A26 U11.160 | length 760.4
  top_copper w7.87: v1(2865,500) U11.160@2865,830
  Bottom Layer w7.87: v1(2865,500) 2890,475 BUS1.A26@2890,185 BUS1.A26@2890,80
/buspci.sch/P_INTA#: BUS1.A6 U11.58 | length 2851.7
  top_copper w7.87: v1(3140,910) 3225,910 3580,1265 U11.58@4078,1265
  Bottom Layer w7.87: BUS1.A6@1890,80 BUS1.A6@1890,185 1890,375 2090,575 2190,575 2390,775 2840,775 2940,875 3015,875 3050,910 v1(3140,910)
/buspci.sch/P_IRDY#: BUS1.B35 U11.18 | length 659.9
  top_copper w7.87: BUS1.B35@3340,80 BUS1.B35@3340,185 3340,325 3355,340 3355,540 3400,585 U11.18@3400,715
/buspci.sch/P_LOCK#: BUS1.B39 U11.23 | length 659
  top_copper w7.87: U11.23@3528,715 3528,563 3505,540 3505,360 3540,325 BUS1.B39@3540,185 BUS1.B39@3540,80
/buspci.sch/P_PAR: BUS1.A43 U11.27 | length 680.6
  top_copper w7.87: U11.27@3630,715 3630,585 3690,525 v1(3690,500)
  Bottom Layer w7.87: v1(3690,500) 3740,450 BUS1.A43@3740,185 BUS1.A43@3740,80
/buspci.sch/P_PERR#: BUS1.B40 U11.24 | length 650.3
  top_copper w7.87: U11.24@3553,715 3553,562 3575,540 3575,340 3590,325 BUS1.B40@3590,185 BUS1.B40@3590,80
/buspci.sch/P_REQ#: BUS1.B18 U11.144 | length 1409.7
  top_copper w7.87: BUS1.B18@2490,80 BUS1.B18@2490,185 2490,325 2475,340 2475,640 2460,655 2460,745 2475,760 2475,995 2719,1239 U11.144@2850,1239
/buspci.sch/P_RST#: BUS1.A15 U11.139 | length 2094.4
  top_copper w7.87: U11.139@2850,1367 2948,1367 3125,1190 3125,950 3000,825 v1(2965,825)
  Bottom Layer w7.87: BUS1.A15@2340,80 BUS1.A15@2340,185 2340,325 2290,375 2290,575 2440,725 2865,725 v1(2965,825)
/buspci.sch/P_SERR#: BUS1.B42 U11.26 | length 670.2
  top_copper w7.87: U11.26@3605,715 3605,570 3650,525 3650,365 3690,325 BUS1.B42@3690,185 BUS1.B42@3690,80
/buspci.sch/P_STOP#: BUS1.A38 U11.22 | length 673.1
  top_copper w7.87: v1(3465,500) 3465,540 3502,577 U11.22@3502,715
  Bottom Layer w7.87: v1(3465,500) 3505,460 3505,340 3490,325 BUS1.A38@3490,185 BUS1.A38@3490,80
/buspci.sch/P_TRDY#: BUS1.A36 U11.19 | length 678.5
  top_copper w7.87: v1(3390,500) 3390,540 3425,575 U11.19@3425,715
  Bottom Layer w7.87: BUS1.A36@3390,80 BUS1.A36@3390,185 3390,325 3355,360 3355,465 v1(3390,500)
/C_OUT: J4.8 R39.1 | length 223.3
  Bottom Layer w7.87: J4.8@565,1020 575,1030 695,1030 705,1040 R39.1@780,1040
/CAS0-: U12.40 U13.40 U14.40 U15.40 U16.40 U17.40 U18.40 U19.40 U24.57 | length 5611.9
  top_copper w7.87: U24.57@4078,2864 4170,2864 4181,2875 4335,2875 4385,2925 4420,2925 4515,2830 4515,2595 4640,2470 v1(4645,2470) ; U13.40@6840,1500 U14.40@6840,1850 U12.40@6840,2200 v1(6840,2430) U16.40@6840,2550 U15.40@6840,2900 U17.40@6840,3250 U18.40@6840,3600 U19.40@6840,3950
  Bottom Layer w7.87: v1(4645,2470) 4660,2485 4800,2485 4875,2410 6825,2410 6840,2425 v1(6840,2430)
/CAS1-: U12.41 U13.41 U14.41 U15.41 U16.41 U17.41 U18.41 U19.41 U24.58 | length 5984.3
  top_copper w7.87: U24.58@4078,2890 4160,2890 4160,2895 4320,2895 4370,2945 4440,2945 4490,2895 v1(4590,2895) ; v1(4590,2720) 4750,2720 4775,2695 4775,2270 v1(4795,2250) ; U13.41@6790,1400 U14.41@6790,1750 U12.41@6790,2100 U16.41@6790,2450 U15.41@6790,2800 U17.41@6790,3150 U18.41@6790,3500 U19.41@6790,3850
  Bottom Layer w7.87: v1(4590,2720) v1(4590,2895) ; v1(4795,2250) 4985,2250 4995,2240 4995,2120 5005,2110 5205,2110 5235,2140 6750,2140 U12.41@6790,2100
/CAS2-: U12.42 U13.42 U14.42 U15.42 U16.42 U17.42 U18.42 U19.42 U24.59 | length 5924.3
  top_copper w7.87: U24.59@4064.21,2911.61 4296.61,2911.61 4350,2965 4460,2965 4500,2925 5000,2925 5025,2900 v1(5025,2165) ; U13.42@6740,1500 U14.42@6740,1850 U12.42@6740,2200 U16.42@6740,2550 U15.42@6740,2900 U17.42@6740,3250 U18.42@6740,3600 U19.42@6740,3950
  Bottom Layer w7.87: v1(5025,2165) 6705,2165 U12.42@6740,2200
/CAS3-: U12.43 U13.43 U14.43 U15.43 U16.43 U17.43 U18.43 U19.43 U24.62 | length 5268.5
  top_copper w7.87: U24.62@4064.21,2988.39 4158.64,2988.39 4165.25,2995 v1(4190,2995) ; U13.43@6690,1400 U14.43@6690,1750 U12.43@6690,2100 U16.43@6690,2450 U15.43@6690,2800 U17.43@6690,3150 U18.43@6690,3500 U19.43@6690,3850
  Bottom Layer w7.87: v1(4190,2995) 4190,3040 4280,3130 4325,3130 4385,3190 4465,3190 4530,3125 4985,3125 5035,3175 5240,3175 5270,3205 5740,3205 5755,3190 6650,3190 U17.43@6690,3150
/CLAMP: U8.37 U8.59 U22.7 U24.75 | length 10069.6
  top_copper w7.87: U24.75@4078,3325 4180,3325 4180,3335 4190,3345 4230,3345 4315,3430 v1(4315,4025) ; v1(9210,2330) v1(9210,3745) v1(9210,3915) ; v1(9945,3640) 10005,3700 10005,3740 10013,3740 U22.7@10013,3800 ; v1(10385,2270) 10405,2290 10405,2550 U8.37@10445,2590
  Bottom Layer w7.87: v1(4315,4025) 4350.46,4025 4405.52,4080.06 7660.59,4080.06 7675.65,4065 8595,4065 8605,4055 8605,3925 8615,3915 v1(9210,3915) ; v1(9210,2330) 9605,2330 U8.59@9645,2290 10010,2290 10030,2270 10230,2270 10240,2260 10350,2260 10360,2270 v1(10385,2270) ; v1(9210,3745) 9618.38,3745 9679.31,3684.07 9679.31,3655.69 9695,3640 v1(9945,3640)
/CLKCAD: U8.38 U8.39 U8.40 U22.2 U24.77 | length 8772
  top_copper w7.87: U24.77@4078,3376 4145,3376 4145,3385 4215,3385 4265,3435 v1(4265,4115) ; v1(10025,4080) 10000,4055 10000,3975 10095,3880 v1(10105,3880) 10105,3850 10110,3845 10110,3800 U22.2@10111,3800 ; v1(10290,3015) 10290,2755 10345,2700 U8.39@10345,2590 U8.40@10345,2490
  Bottom Layer w7.87: v1(4265,4115) 4289.75,4115 4302.05,4127.3 7680.16,4127.3 7682.47,4125 9440,4125 9502.5,4062.5 10007.5,4062.5 v1(10025,4080) ; v1(10105,3880) 10295,3880 10320,3855 10320,3745.65 10325.06,3740.59 10325.06,3690.06 10305,3670 10305,3313.38 10309.31,3309.07 10309.31,3234.31 10290,3215 v1(10290,3015) ; U8.40@10345,2490 U8.38@10445,2490
/CLKCDA: U9.9 U22.79 U24.76 | length 9318.5
  top_copper w7.87: U24.76@4078,3351 4160,3351 4160,3365 4220,3365 4285,3430 4285,4080 4295,4090 v1(4340,4090) ; v1(10040,3980) 10060,3980 v1(10190,3850) ; U22.79@10200,3318 10257,3318 v1(10280,3295) ; v1(10255,2985) 10255,2755 10300,2710 10300,2460 v1(10335,2425)
  Bottom Layer w7.87: v1(4340,4090) 4361.56,4111.56 7673.64,4111.56 7680.2,4105 9435,4105 9515,4025 9995,4025 v1(10040,3980) ; v1(10190,3850) 10214.75,3850 10284.31,3780.44 10284.31,3759.07 10309.31,3734.07 10309.31,3704.31 10280,3675 v1(10280,3295) 10255,3270 v1(10255,2985) ; v1(10335,2425) 10565,2425 10600,2390 10600,2370 10640,2330 10780,2330 10850,2400 U9.9@11015,2400
/CSYNC-OUT: R30.2 U9.8 U22.9 U24.13 | length 16603.5
  top_copper w7.87: v1(1395,3795) 1395,3695 1315,3615 1315,3075 1340,3050 1430,3050 1450,3030 1450,2490 v1(1405,2445) ; v1(1945,2525) 1945,2420 2010,2355 v1(2010,2250) ; v1(3272,2250) U24.13@3272,2340 ; U22.9@9974,3800 9974,4100 v1(9975,4100) ; U9.8@11115,2300 11175,2360 v1(11175,2630) ; v1(11280,3900) 11335,3900 v1(11370,3935)
  Bottom Layer w7.87: R30.2@1160,2510 1260,2510 1325,2445 v1(1405,2445) 1665,2445 1745,2525 v1(1945,2525) ; v1(1395,3795) 1500,3900 1500,4095 1580,4175 4131.31,4175 4135.42,4179.11 4163.56,4179.11 4167.67,4175 9975,4175 ; v1(2010,2250) 2445,2250 2470,2225 2960,2225 2980,2205 3205,2205 3250,2250 v1(3272,2250) ; v1(9975,4100) 9975,4175 ; v1(11175,2630) 11215,2670 11215,3800 11280,3865 v1(11280,3900) ; v1(11370,3935) 11370,4035 11360,4045 11305,4045 11175,4175 9975,4175
/CSYNCIN-: U8.8 U24.54 | length 7926.8
  top_copper w7.87: U24.54@4078,2787 4150,2787 4150,2795 4215,2795 4230,2780 4230,2730 4250,2710 4285,2710 4320,2745 v1(4420,2745) ; v1(4550,2760) 4745,2760 4795,2710 4795,2330 4825,2300 4855,2300 4865,2290 4865,2220 4840,2195 4840,1580 4850,1570 5095,1570 5130,1535 v1(5130,1460)
  Mid-Layer 2 w7.87: v1(4420,2745) 4435,2760 v1(4550,2760) ; v1(9445,1495) 9465,1495 9500,1530 10405,1530 U8.8@10445,1490
  Bottom Layer w7.87: v1(5130,1460) 6970,1460 7040,1530 7145,1530 7210,1465 9180,1465 9275,1370 9375,1370 9445,1440 v1(9445,1495)
/DQ0: RR7.2 U3.2 U8.16 U9.14 U10.92 U11.100 U23.13 U24.21 | length 12290.3
  top_copper w7.87: U23.13@1901,2690 1901,2414 1965,2350 v1(1965,2300) ; v1(3390,2500) 3440,2500 3470,2470 3470,2425 3477,2425 3477,2340 3477,2200 3460,2185 v1(3460,2030) 3477,2015 U11.100@3477,1943 ; U8.16@10745,1690 10775,1690 10795,1710 v1(10795,1925) 10795,1965 10785,1975 10785,2300 10820,2335 10820,2360 10875,2415 10875,2745 10879,2745 U10.92@10879,2802
  Mid-Layer 2 w7.87: v1(3460,2030) 3500,2030 3515,2015 3995,2015 v1(4035,2055) ; v1(10795,1925) 10795,1965 10785,1975 10785,2070 10800,2085 10915,2085 U9.14@10915,2100
  Bottom Layer w7.87: RR7.2@1515,1800 1615,1800 1625,1810 1625,2035 1700,2110 1775,2110 v1(1965,2300) 2040,2375 2130,2375 2180,2425 3260,2425 3335,2500 v1(3390,2500) ; v1(4035,2055) 4345,2055 4455,2055 4480,2030 4480,1990 4535,1935 4810,1935 4815,1940 7365,1940 7375,1930 10765,1930 10770,1925 v1(10795,1925)
/DQ1: RR7.3 U3.3 U8.15 U9.15 U10.93 U11.99 U23.12 U24.22 | length 12461.5
  top_copper w7.87: U23.12@1876,2690 1876,2389 1915,2350 v1(1915,2300) ; v1(3390,2550) 3415,2550 3502,2463 3502,2340 3502,2190 3490,2180 v1(3490,2065) 3490,2050 3502,2040 U11.99@3502,1943 ; U8.15@10645,1590 10645,1620 10655,1630 10760,1630 10815,1685 10815,1890 10825,1900 10825,1995 v1(10815,1995) 10815,2025 10810,2030 10810,2300 10840,2330 10840,2355 10895,2410 10895,2735 10900,2740 10902,2740 10902,2800 U10.93@10904,2802
  Mid-Layer 2 w7.87: v1(3490,2065) 3510,2065 3540,2035 3940,2035 4010,2105 v1(4035,2105) ; v1(10815,1995) 10865,1995 10875,2005 10875,2020 10895,2040 10985,2040 11015,2070 U9.15@11015,2100
  Bottom Layer w7.87: RR7.3@1515,1900 1590,1900 1600,1910 1600,2045 1685,2130 1745,2130 v1(1915,2300) 2010,2395 2125,2395 2175,2445 3255,2445 3360,2550 v1(3390,2550) ; v1(4035,2105) 4345,2105 4450,2105 4505,2050 4505,2000 4550,1955 4795,1955 4800,1960 7380,1960 7390,1950 10770,1950 v1(10815,1995)
/DQ2: RR7.4 U3.4 U8.14 U9.16 U10.94 U11.98 U23.11 U24.23 | length 12247
  top_copper w7.87: v1(1850,2285) U23.11@1850,2690 ; v1(3440,2575) 3528,2487 3528,2340 3528,2180 3515,2180 3515,2110 v1(3520,2105) 3520,2080 3528,2070 U11.98@3528,1943 ; U8.14@10745,1590 10835,1680 10835,1885 10845,1895 10845,2000 ; U9.16@10915,2000 10845,2000 ; U10.94@10930,2802 10925,2800 10925,2740 10915,2730 10915,2400 10860,2345 10860,2325 10830,2295 10830,2080 10845,2065 10845,2000
  Mid-Layer 2 w7.87: v1(3520,2105) 3940,2105 3990,2155 v1(4035,2155)
  Bottom Layer w7.87: RR7.4@1515,2000 1565,2000 1575,2010 1575,2065 1660,2150 1715,2150 v1(1850,2285) 1980,2415 2120,2415 2170,2465 3245,2465 3380,2600 3415,2600 v1(3440,2575) ; v1(4035,2155) 4345,2155 4430,2155 4525,2060 4525,2010 4560,1975 4770,1975 4775,1980 7390,1980 7400,1970 8980,1970 8990,1980 9425,1980 9475,2030 10790,2030 10795,2035 10880,2035 U9.16@10915,2000
/DQ3: RR7.5 U3.5 U8.13 U9.17 U10.95 U11.96 U23.7 U24.24 | length 13044.5
  top_copper w7.87: v1(1735,2220) 1735,2400 1745,2410 1745,2690 U23.7@1748,2690 ; v1(3490,2575) 3553,2512 3553,2340 3553,2270 3545,2270 v1(3545,2140) 3545,2128 3555,2118 3555,2074 3579,2050 U11.96@3579,1943 ; v1(4555,2090) 4760,2090 v1(4795,2055) ; v1(10865,2130) 10865,2305 10880,2320 10880,2340 10935,2395 10935,2720 10955,2740 U10.95@10955,2802
  Mid-Layer 2 w7.87: v1(3545,2140) 3555,2130 3905,2130 3980,2205 v1(4035,2205) ; U8.13@10645,1490 10685,1450 11045,1450 11055,1460 11055,1750 11045,1760 10995,1760 10975,1780 10975,1960 U9.17@11015,2000 11050,2000 11060,2010 11060,2130 11050,2140 10895,2140 10885,2130 v1(10865,2130)
  Bottom Layer w7.87: RR7.5@1515,2100 1575,2100 1640,2170 1685,2170 v1(1735,2220) 1950,2435 2110,2435 2160,2485 3235,2485 3375,2625 3440,2625 v1(3490,2575) ; v1(4035,2205) 4060,2180 4275,2180 4300,2205 4349.96,2205 4440,2205 v1(4555,2090) ; v1(4795,2055) 4850,2000 8890,2000 8900,1990 8970,1990 8980,2000 9415,2000 9465,2050 9720,2050 9760,2095 9775,2110 10105,2110 10125,2090 10570,2090 10610,2130 v1(10865,2130)
/DQ4: RR7.6 U3.6 U8.12 U9.18 U10.96 U11.95 U23.9 U24.25 | length 12670.7
  top_copper w7.87: U23.9@1799,2690 1799,2405 1819,2385 v1(1819,2355) ; v1(3540,2575) 3579,2536 3579,2340 3579,2275 3575,2275 v1(3575,2175) 3575,2155 3585,2145 3585,2080 3605,2060 U11.95@3605,1943 ; v1(4485,2255) 4485,2080 4505,2060 v1(4505,1915) ; U8.12@10745,1490 10805,1490 10825,1510 10825,1545 10855,1575 10855,1880 10875,1900 U9.18@10915,1900 10955,1940 10955,2710 10980,2735 10980,2780 U10.96@10981,2802
  Mid-Layer 2 w7.87: v1(3575,2175) 3600,2175 3625,2150 3880,2150 3970,2240 4065,2240 4095,2210 v1(4215,2210)
  Bottom Layer w7.87: RR7.6@1515,2200 1665,2200 v1@1820,2355 ; v1(1819,2355) v1@1820,2355 ; v1(3540,2575) 3465,2650 3370,2650 3225,2505 2155,2505 2105,2455 1920,2455 v1@1820,2355 ; v1(4215,2210) 4225,2210 4270,2255 4345,2255 v1(4485,2255) ; v1(4505,1915) 4815,1915 4820,1920 7285,1920 7290,1915 7365,1915 7375,1905 7375,1795 7385,1785 7815,1785 7830,1770 7830,1660 7840,1650 8030,1650 8135,1545 9005,1545 9020,1530 10370,1530 10400,1500 10400,1475 10425,1450 10735,1450 10745,1460 U8.12@10745,1490
/DQ5: RR7.7 U3.7 U8.11 U9.19 U10.97 U11.94 U23.8 U24.26 | length 12921.7
  top_copper w7.87: v1(1765,2350) 1765,2382 1773,2390 U23.8@1773,2690 ; v1(3590,2575) 3605,2560 3605,2340 3605,2095 3630,2070 U11.94@3630,1943 ; v1(4545,2305) v1(4545,2455) ; v1(10845,1390) 10845,1540 10875,1570 10875,1850 10885,1860 10975,1860 U9.19@11015,1900 10975,1940 10975,2580 10985,2590 v1(10985,2625) 10985,2710 11005,2730 11005,2800 U10.97@11007,2802
  Mid-Layer 2 w7.87: v1(3590,2575) 3590,2440 3615,2415 4040,2415 4115,2340 v1(4115,2305)
  Bottom Layer w7.87: RR7.7@1515,2300 1715,2300 v1(1765,2350) 1890,2475 2095,2475 2145,2525 3215,2525 3365,2675 3490,2675 v1(3590,2575) ; v1(4115,2305) 4345,2305 v1(4545,2305) ; v1(4545,2455) 4605,2515 4790,2515 4940,2665 6360,2665 6375,2650 6445,2650 6485,2690 7320,2690 7360,2650 10160,2650 10180,2630 10885,2630 10890,2625 v1(10985,2625) ; U8.11@10645,1390 v1(10845,1390)